# EAGLE board Mechanical_Clock (EAGLE 9.7.0)
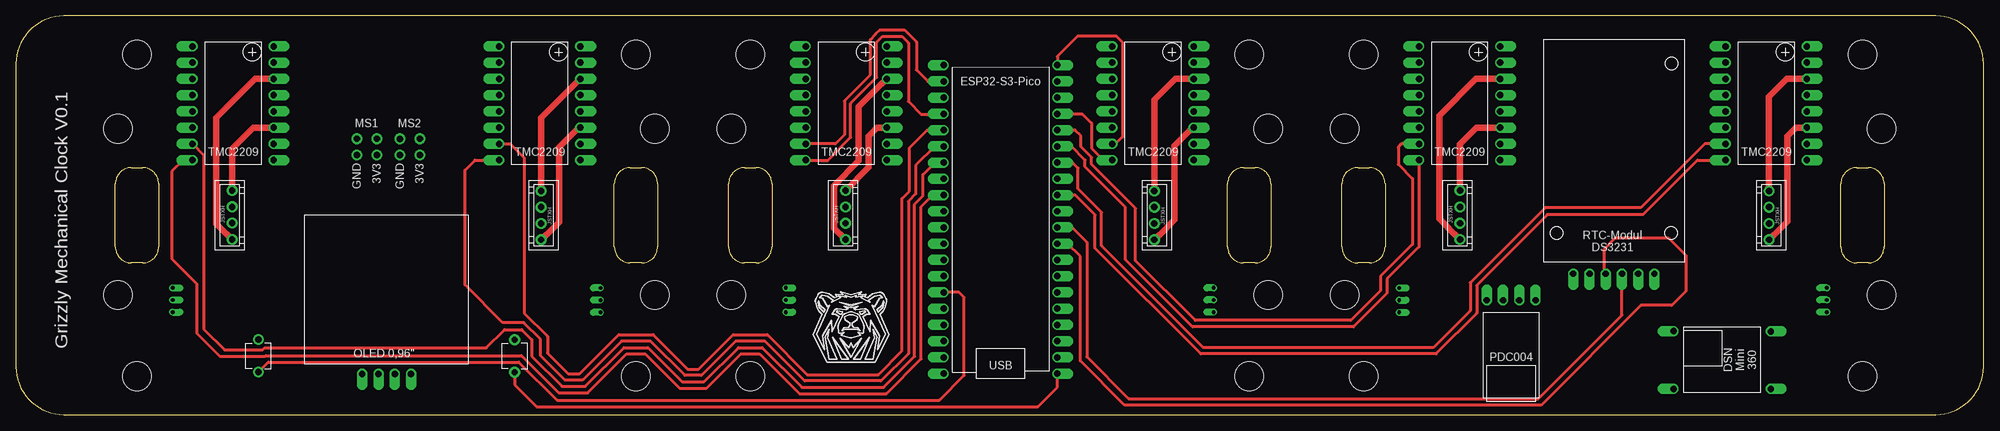
[diagram p0: board, top side]
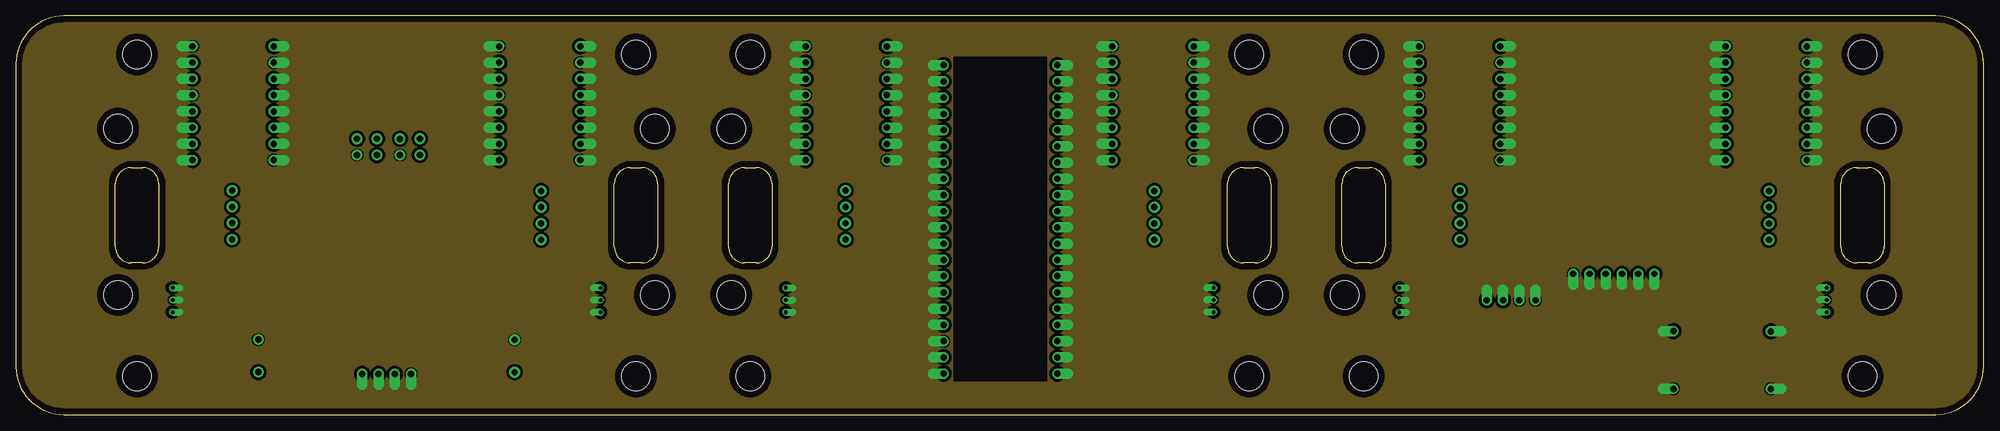
[diagram p1: board, inner layer Route2]
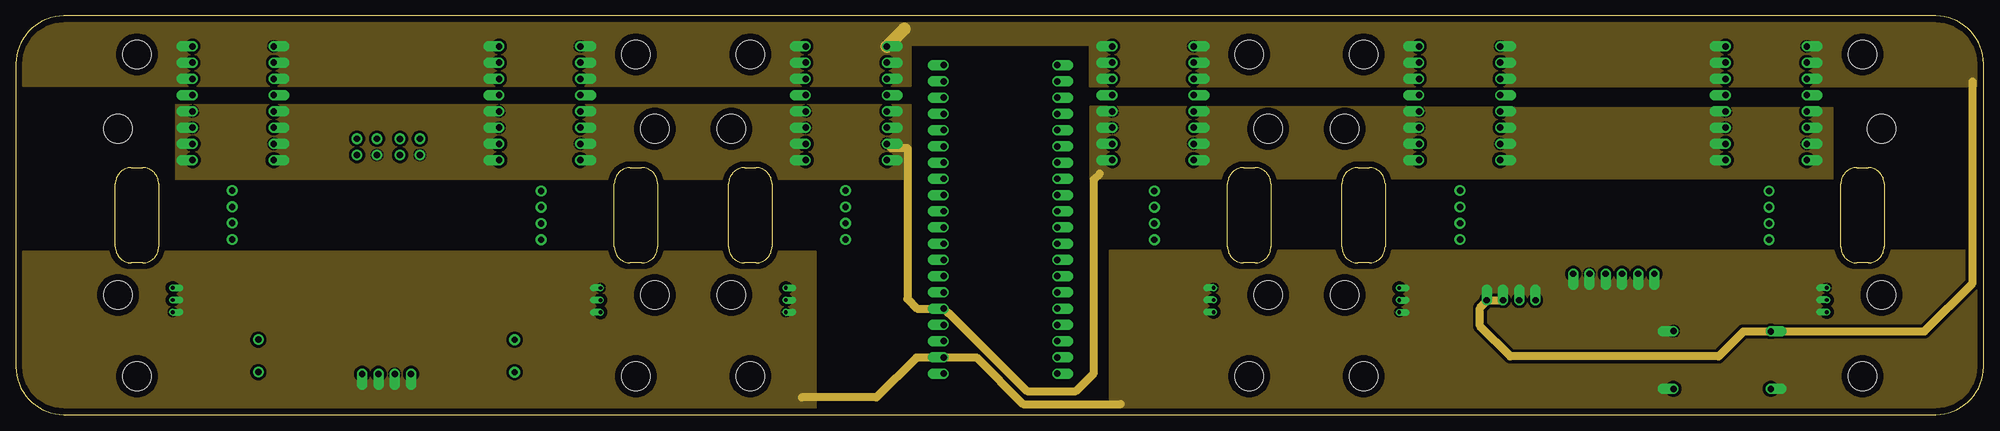
[diagram p2: board, inner layer Route63]
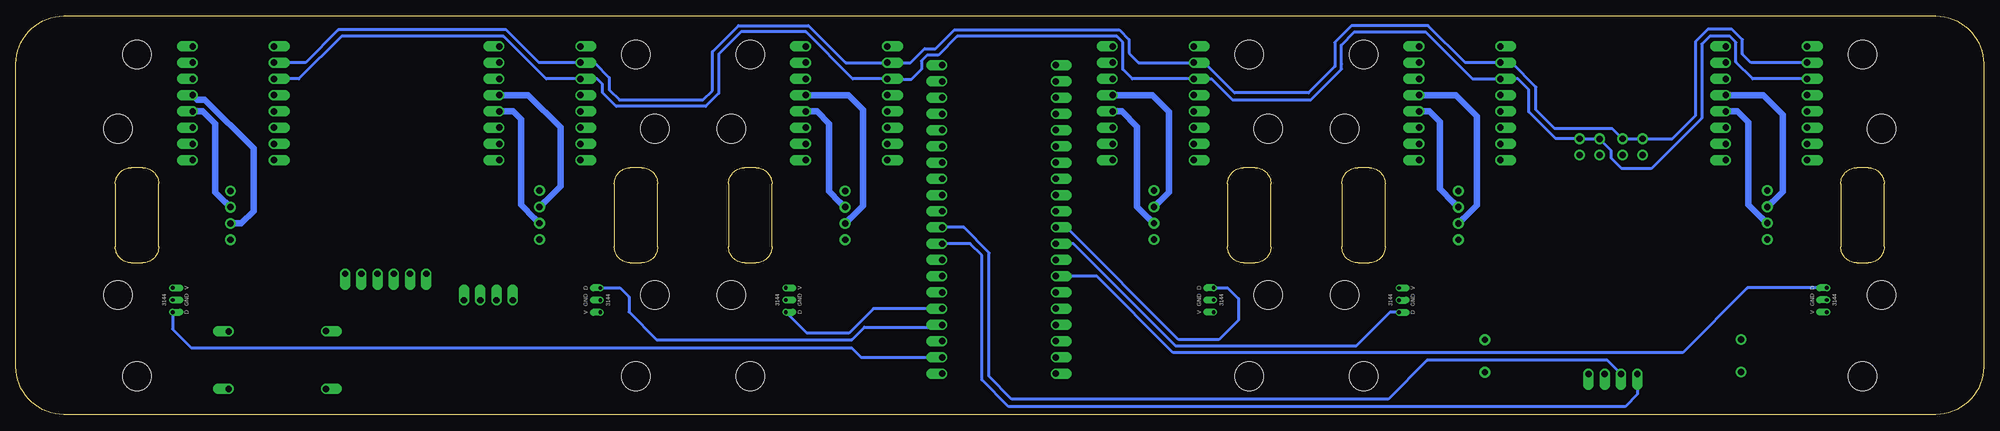
[diagram p3: board, bottom side, seen from below]

Size 308 x 62.38 mm. Coordinates in mm from the lower left corner, seen from the top.
Outline: 207.56,26.25 arc90 210.06,23.75 211.83,23.75 arc90 214.33,26.25 214.33,36.14 arc90 211.83,38.64 210.06,38.64 arc90 207.56,36.14 207.56,26.25
Outline: 93.67,26.25 arc90 96.17,23.75 97.94,23.75 arc90 100.44,26.25 100.44,36.14 arc90 97.94,38.64 96.17,38.64 arc90 93.67,36.14 93.67,26.25
Outline: 189.67,26.25 arc90 192.17,23.75 193.94,23.75 arc90 196.44,26.25 196.44,36.14 arc90 193.94,38.64 192.17,38.64 arc90 189.67,36.14 189.67,26.25
Outline: 111.56,26.25 arc90 114.06,23.75 115.83,23.75 arc90 118.33,26.25 118.33,36.14 arc90 115.83,38.64 114.06,38.64 arc90 111.56,36.14 111.56,26.25
Outline: 15.56,26.25 arc90 18.06,23.75 19.83,23.75 arc90 22.33,26.25 22.33,36.14 arc90 19.83,38.64 18.06,38.64 arc90 15.56,36.14 15.56,26.25
Outline: 289.94,23.75 arc90 292.44,26.25 292.44,36.14 arc90 289.94,38.64 288.17,38.64 arc90 285.67,36.14 285.67,26.25 arc90 288.17,23.75 289.94,23.75
Outline: 300.5,62.38 7.5,62.38 arc90 0,54.88 0,7.5 arc90 7.5,0 300.5,0 arc90 308,7.5 308,54.88 arc90 300.5,62.38
Copper layers (1+2*15+16): Top / Route2 / Route63 / Bottom
Stack-up 4 Layer Stack: Top SilkScreen Epoxy Ink / Top SolderMask SR:Green 0.0254mm Dk 4.3 / Top Surface Finish Lead-Free 0.02mm / Top CuFoil:007 0.035mm / Dielectric-1 Prepreg:001 0.064mm / Dielectric-2 Prepreg:001 0.064mm / Route2 CuFoil:007 0.035mm / Dielectric-3 Core:066 0.711mm / Route63 CuFoil:007 0.035mm / Dielectric-4 Prepreg:001 0.064mm / Dielectric-5 Prepreg:001 0.064mm / Bottom CuFoil:007 0.035mm / Bottom Surface Finish Lead-Free 0.02mm / Bottom SolderMask SR:Green 0.0254mm Dk 4.3 / Bottom SilkScreen Epoxy Ink
Design rules: minimum drill size 0.35mm, minimum copper width 0.3mm, keepout clearance 0mil, drill distance 6mil, via restrict clearance 0mil, dimension clearance 1mm, restrict clearance 0mil, copper clearance wire_polygon to wire_polygon 0.5mm, copper clearance wire_polygon to pad_smd 0.5mm, copper clearance wire_polygon to via 0.5mm, copper clearance pad_smd to pad_smd 0.5mm, copper clearance pad_smd to via 0.5mm, copper clearance via to via 0.5mm, copper clearance smd to pad (same net) 0.5mm, copper clearance smd to via (same net) 0.5mm, copper clearance smd to smd (same net) 0.5mm
Holes 4.5 mm at 196,18.73 208,18.73 114.95,6 289.05,6 193.05,6 289.05,56.38 193.05,56.38 97.05,6 210.95,6 208,44.73 100,44.73 196,44.73 16,44.73 97.05,56.38 210.95,56.38 18.95,6 292,44.73 112,44.73 114.95,56.38 292,18.73 18.95,56.38 16,18.73 112,18.73 100,18.73
RestrictCopper: area 146.8,5.2 to 161.4,56

## Footprints (pad centres in the part's own frame; a part is rotated, then mirrored left to right if it is on the bottom)
ESP32-S3-PICO = drill 1 pad 1.676 offset: 3V3 12.7,-2.54; 3V3_EN 12.7,0; GND1 -5.08,2.54; GND2 -5.08,-10.16; GND3 -5.08,-22.86; GND4 -5.08,-35.56; GND5 12.7,-35.56; GND6 12.7,-22.86; GND7 12.7,-10.16; GND8 12.7,2.54; GPIO1 12.7,-33.02; GPIO2 12.7,-30.48; GPIO4 12.7,-27.94; GPIO5 12.7,-25.4; GPIO6 12.7,-20.32; GPIO7 12.7,-15.24; GPIO8 12.7,-12.7; GPIO9 12.7,-7.62; GPIO10 12.7,-5.08; GPIO11 -5.08,7.62; GPIO12 -5.08,5.08; GPIO13 -5.08,0; GPIO14 -5.08,-2.54; GPIO15 -5.08,-5.08; GPIO16 -5.08,-7.62; GPIO17 -5.08,-12.7; GPIO18 -5.08,-15.24; GPIO33 -5.08,-17.78; GPIO34 -5.08,-20.32; GPIO35 -5.08,-25.4; GPIO36 -5.08,-27.94; GPIO37 -5.08,-30.48; GPIO38 -5.08,-33.02; GPIO39 -5.08,-38.1; GPIO40 -5.08,-40.64; GPIO41 12.7,-38.1; GPIO42 12.7,-40.64; RUN 12.7,-17.78; VBUS 12.7,7.62; VSYS 12.7,5.08
PDC004-PD = drill 1 pad 1.676 offset: GND1 1.27,2.54; GND2 3.81,2.54; V1 -3.81,2.54; V2 -1.27,2.54
DSN-MINI-360 = drill 1 pad 1.676 offset: IN+ 3.819,-9.86; IN- -5.18,-9.86; OUT+ 3.86,5.371; OUT- -5.18,5.38
OLED_0,96 = drill 1 pad 1.676 offset: GND 4.65,18.45; SCL 9.75,18.45; SDA 12.3,18.45; VCC 7.2,18.45
DS3231_RTC_MODUL = drill 1 pad 1.676 offset: 32K -0.21,3.81; GND 12.49,3.81; SCL 4.87,3.81; SDA 7.41,3.81; SQW 2.33,3.81; VCC 9.95,3.81
TMC2209 = drill 1 pad 1.676 offset: 1A 7.62,-6.35; 1B 7.62,-8.89; 2A 7.62,-3.81; 2B 7.62,-1.27; DIR -5.08,-13.97; EN -5.08,3.81; GND 7.62,1.27; GND1 7.62,-13.97; MS1 -5.08,1.27; MS2 -5.08,-1.27; RX -5.08,-8.89; SPREAD -5.08,-3.81; STEP -5.08,-11.43; TX -5.08,-6.35; VIO 7.62,-11.43; VMOT 7.62,3.81
JSTXH_4POL = drill 1 pad 1.676: 1 -0.2,2.45; 2 -0.2,-0.1; 3 -0.2,-2.65; 4 -0.2,-5.2
LOETBRUECKE = drill 1 pad 1.676: 1 0,-2.54; 2 0,0
A3144 = drill 0.6 offset: DATA 1.905,1.27; GND 0,1.27; V -1.905,1.27
SCHALTER_5X5 = drill 1 pad 1.676: 1 -2.54,0; 2 2.54,0

## Placement (x,y rotation side)
U$1  ESP32-S3-PICO  [ESP32-S3-PICO]  157.93,14.04 180 top
U$2  PDC004-PD  [PDC004-PD]  234.05,15.35 0 top
U$3  DSN-MINI-360  [DSN-MINI-360]  264.84,9.21 90 top
U$4  OLED_0,96  [OLED_0,96]  66.49,24.81 180 top
U$5  DS3231_RTC_MODUL  [DS3231_RTC_MODUL]  256.26,25.84 180 top
U$6  TMC2209  [TMC2209]  80.71,53.8 0 top
U$7  JSTXH_4POL  [JSTXH_4POL]  82.01,29.81 180 top
U$8  TMC2209  [TMC2209]  32.72,53.8 0 top
U$9  JSTXH_4POL  [JSTXH_4POL]  34.04,32.61 0 top
U$10  LOETBRUECKE  [LOETBRUECKE]  56.51,43.16 0 top
U$11  LOETBRUECKE  [LOETBRUECKE]  63.22,43.17 0 top
U$12  LOETBRUECKE  [LOETBRUECKE]  53.38,43.16 0 top
U$13  LOETBRUECKE  [LOETBRUECKE]  60.12,43.16 0 top
U$14  A3144  [A3144]  23.25,17.94 90 bottom
U$15  SCHALTER_5X5  [SCHALTER_5X5]  37.94,9.19 90 top
U$16  SCHALTER_5X5  [SCHALTER_5X5]  78.06,9.17 90 top
U$17  A3144  [A3144]  92.78,17.91 270 bottom
U$18  TMC2209  [TMC2209]  128.71,53.8 0 top
U$19  JSTXH_4POL  [JSTXH_4POL]  130.06,32.6 0 top
U$20  A3144  [A3144]  119.23,17.93 90 bottom
U$21  TMC2209  [TMC2209]  176.71,53.8 0 top
U$22  JSTXH_4POL  [JSTXH_4POL]  178,29.81 180 top
U$23  A3144  [A3144]  188.75,17.94 270 bottom
U$24  TMC2209  [TMC2209]  224.71,53.8 0 top
U$25  JSTXH_4POL  [JSTXH_4POL]  226.24,32.6 0 top
U$26  A3144  [A3144]  215.25,17.91 90 bottom
U$27  TMC2209  [TMC2209]  272.71,53.8 0 top
U$28  JSTXH_4POL  [JSTXH_4POL]  274.21,29.81 180 top
U$29  A3144  [A3144]  284.74,17.94 270 bottom

## Library data of the parts
U$1-U$29 = Library FÖB

## Nets
3V3: U$1.3V3 U$6.RX U$6.TX U$6.VIO U$8.RX U$8.TX U$8.VIO U$10.1 U$11.1 U$18.RX U$18.TX U$18.VIO U$21.RX U$21.TX U$21.VIO U$24.RX U$24.TX U$24.VIO U$27.RX U$27.TX U$27.VIO
5V: U$1.VSYS U$3.OUT+ U$4.VCC U$5.VCC U$14.V U$17.V U$20.V U$23.V U$26.V U$29.V
20V: U$2.V1 U$2.V2 U$3.IN+ U$6.VMOT U$8.VMOT U$18.VMOT U$21.VMOT U$24.VMOT U$27.VMOT
BUTTON_MENU: U$1.GPIO10 U$15.1
BUTTON_SETTING: U$1.GPIO11 U$16.1
GND: U$1.GND8 U$2.GND1 U$2.GND2 U$3.IN- U$3.OUT- U$4.GND U$5.GND U$6.EN U$6.GND U$6.GND1 U$6.SPREAD U$8.EN U$8.GND U$8.GND1 U$8.SPREAD U$12.1 U$13.1 U$14.GND U$15.2 U$16.2 U$17.GND U$18.EN U$18.GND U$18.GND1 U$18.SPREAD U$20.GND U$21.EN U$21.GND U$21.GND1 U$21.SPREAD U$23.GND U$24.EN U$24.GND U$24.GND1 U$24.SPREAD U$26.GND U$27.EN U$27.GND U$27.GND1 U$27.SPREAD U$29.GND
I2C_SCL: U$1.GPIO18 U$4.SCL U$5.SCL
I2C_SDA: U$1.GPIO17 U$4.SDA U$5.SDA
MOTOR1_1A: U$8.1A U$9.3
MOTOR1_1B: U$8.1B U$9.1
MOTOR1_2A: U$8.2A U$9.2
MOTOR1_2B: U$8.2B U$9.4
MOTOR1_DIR: U$1.GPIO6 U$8.DIR
MOTOR1_HALLSENSOR: U$1.GPIO9 U$14.DATA
MOTOR1_STEP: U$1.GPIO5 U$8.STEP
MOTOR2_1A: U$6.1A U$7.3
MOTOR2_1B: U$6.1B U$7.1
MOTOR2_2A: U$6.2A U$7.2
MOTOR2_2B: U$6.2B U$7.4
MOTOR2_DIR: U$1.GPIO4 U$6.DIR
MOTOR2_HALLSENSOR: U$1.GPIO8 U$17.DATA
MOTOR2_STEP: U$1.GPIO2 U$6.STEP
MOTOR3_1A: U$18.1A U$19.3
MOTOR3_1B: U$18.1B U$19.1
MOTOR3_2A: U$18.2A U$19.2
MOTOR3_2B: U$18.2B U$19.4
MOTOR3_DIR: U$1.GPIO1 U$18.DIR
MOTOR3_HALLSENSOR: U$1.GPIO7 U$20.DATA
MOTOR3_STEP: U$1.GPIO41 U$18.STEP
MOTOR4_1A: U$21.1A U$22.3
MOTOR4_1B: U$21.1B U$22.1
MOTOR4_2A: U$21.2A U$22.2
MOTOR4_2B: U$21.2B U$22.4
MOTOR4_DIR: U$1.GPIO38 U$21.DIR
MOTOR4_HALLSENSOR: U$1.GPIO14 U$23.DATA
MOTOR4_STEP: U$1.GPIO40 U$21.STEP
MOTOR5_1A: U$24.1A U$25.3
MOTOR5_1B: U$24.1B U$25.1
MOTOR5_2A: U$24.2A U$25.2
MOTOR5_2B: U$24.2B U$25.4
MOTOR5_DIR: U$1.GPIO36 U$24.DIR
MOTOR5_HALLSENSOR: U$1.GPIO13 U$26.DATA
MOTOR5_STEP: U$1.GPIO37 U$24.STEP
MOTOR6_1A: U$27.1A U$28.3
MOTOR6_1B: U$27.1B U$28.1
MOTOR6_2A: U$27.2A U$28.2
MOTOR6_2B: U$27.2B U$28.4
MOTOR6_DIR: U$1.GPIO34 U$27.DIR
MOTOR6_HALLSENSOR: U$1.GPIO12 U$29.DATA
MOTOR6_STEP: U$1.GPIO35 U$27.STEP
MS1: U$6.MS1 U$8.MS1 U$10.2 U$12.2 U$18.MS1 U$21.MS1 U$24.MS1 U$27.MS1
MS2: U$6.MS2 U$8.MS2 U$11.2 U$13.2 U$18.MS2 U$21.MS2 U$24.MS2 U$27.MS2
N$1: U$1.GND7
N$2: U$1.GPIO33

## Tracks (layer width: path | path; a pad name or v marks a point on that pad's centre or on a via)
3V3
  Route63 1.27: U$18.VIO 136.98,41.72 139.53,41.72 139.53,18.11 141.06,16.58 U$1.3V3 145.88,15.93 146.02,15.93 158.29,3.65 165.9,3.65 168.72,6.47 168.72,36.79 169.65,37.72
  pour Route63: 168.06,48.31 168.06,36.79 284.5,36.79 284.5,48.1
  pour Route63: 24.95,48.6 140.16,48.6 140.16,36.74 24.95,36.74
5V
  Route63 1.27: 122.99,2.69 134.7,2.69 140.94,8.93 145.2,8.93 U$1.VSYS 150.34,8.96 157.66,1.64 172.91,1.64
  pour Route63: -6.38,25.61 125.32,25.61 125.32,-7.99 -3.86,-7.99 -3.86,3.08 -3.76,3.08 -3.76,4.76
  pour Route63: 322.28,-11 171.1,-11 171.1,25.76 318.05,25.76 318.05,19.22 319.2,19.22
20V
  Route63 1.27: U$2.V1 U$2.V2 230.36,17.89 229.17,16.7 229.17,13.85 233.9,9.12 266.54,9.12 270.45,13.03 U$3.IN+ 298.76,13.03 306.31,20.58 306.31,52.09
  Route63 2: U$18.VMOT 139.05,60.33
  pour Route63: 167.97,66.02 167.97,51.26 313.86,51.26 313.86,66.35
  pour Route63: -10.12,70.7 -10.12,51.31 140.15,51.31 140.15,71.96 139.34,71.96
  pour Route63: 136.54,68.51 136.54,57.69 182.85,57.69 182.85,69.04 182.13,69.04
BUTTON_MENU
  Top 0.508: U$1.GPIO10 147.64,19.12 148.42,18.34 148.42,6.14 144.54,2.26 84.69,2.26 78.72,8.23 39.52,8.23 39.43,8.14 | U$15.1 39.43,8.14 | 39.43,8.14
BUTTON_SETTING
  Top 0.508: U$16.1 78.06,4.68 81.49,1.25 159.96,1.25 163.01,4.3 U$1.GPIO11
GND
  pour Route2: -7.77,69.71 325.28,69.71 325.28,-22.06 -9.77,-22.06 -9.77,-7.16
I2C_SCL
  Top 0.508: U$5.SCL 251.39,15.58 238.31,2.5 174.18,2.5 167.64,9.04 167.64,26.95 165.31,29.28 U$1.GPIO18
  Bottom 0.508: U$1.GPIO18 159.63,29.28 155.67,25.32 155.67,5.97 152.12,2.42 93.17,2.42 87.11,8.49 58.87,8.49 U$4.SCL
I2C_SDA
  Top 0.508: U$1.GPIO17 164.62,26.74 166.6,24.77 166.6,8.42 173.53,1.49 238.76,1.49 254.37,17.1 259.18,17.1 261.36,19.28 261.36,24.91 258.63,27.64 250.38,27.64 248.65,25.91 248.65,22.23 U$5.SDA
  Bottom 0.508: U$4.SDA 54.19,3.16 56.1,1.25 152.62,1.25 156.81,5.44 156.81,24.92 158.63,26.74 U$1.GPIO17
MOTOR1_1A
  Bottom 1: U$9.3 34.56,30.68 34.6,30.68 36.79,32.86 36.79,45.71 38.53,47.45 U$8.1A
MOTOR1_1B
  Top 1: U$9.1 33.84,41.62 37.13,44.91 U$8.1B
MOTOR1_2A
  Bottom 1: U$9.2 33.13,33.23 33.08,33.23 31.41,34.89 31.41,46.92 34.48,49.99 U$8.2A
MOTOR1_2B
  Top 1: U$9.4 33.13,28.13 33.08,28.13 31.36,29.84 31.36,46.47 37.42,52.53 U$8.2B
MOTOR1_DIR
  Top 0.5: U$8.DIR 26.19,39.83 24.41,38.05 24.41,24.38 28.32,20.47 28.32,12.7 31.88,9.15 39.02,9.15 39.1,9.23 79.14,9.23 84.97,3.4 89.51,3.4 95.6,9.5 98.5,9.5 103.88,4.12 108.12,4.12 113.5,9.5 116.4,9.5 122.63,3.27 136.24,3.27 141.68,8.71 141.68,32.54 143.51,34.36 U$1.GPIO6
MOTOR1_HALLSENSOR
  Bottom 0.508: U$14.DATA 36.96,19.85 47.1,9.71 126.85,9.71 138.81,21.66 U$1.GPIO9
MOTOR1_STEP
  Top 0.5: U$8.STEP 29.41,40.6 29.41,13.39 32.66,10.15 38.6,10.15 38.9,10.44 73.63,10.44 76.49,13.3 79.17,13.3 80.73,11.74 80.73,9.16 85.49,4.4 89.09,4.4 95.19,10.5 98.92,10.5 104.29,5.12 107.71,5.12 113.08,10.5 116.81,10.5 123.05,4.27 135.82,4.27 140.68,9.13 140.68,32.96 141.97,34.24 141.97,37.56 143.85,39.44 U$1.GPIO5
MOTOR2_1A
  Bottom 1: U$7.3 82.93,33.18 82.97,33.18 85.13,35.33 85.13,45.84 86.74,47.45 U$6.1A
MOTOR2_1B
  Top 1: U$7.1 82.93,28.08 82.97,28.08 85.03,30.13 85.03,41.86 88.08,44.91 U$6.1B
MOTOR2_2A
  Bottom 1: U$7.2 81.5,30.63 81.45,30.63 79.32,32.75 79.32,46.68 82.63,49.99 U$6.2A
MOTOR2_2B
  Top 1: U$6.2B 87.63,51.83 87.57,51.83 82.21,46.47 U$7.4
MOTOR2_DIR
  Top 0.5: U$6.DIR 71.84,39.83 70.27,38.26 70.27,20.29 76.18,14.38 79.5,14.38 82.11,11.77 82.11,9.21 85.92,5.4 88.68,5.4 94.77,11.5 99.33,11.5 104.71,6.12 107.29,6.12 112.67,11.5 117.23,11.5 123.46,5.27 135.41,5.27 139.68,9.54 139.68,33.37 140.85,34.54 140.85,38.99 143.85,41.98 U$1.GPIO4
MOTOR2_HALLSENSOR
  Bottom 0.508: U$17.DATA 92.93,16.01 98.22,10.72 126.44,10.72 142.46,26.74 U$1.GPIO8
MOTOR2_STEP
  Top 0.5: U$6.STEP 77.38,42.37 79.57,40.18 79.57,15.88 83.2,12.25 83.2,9.62 86.42,6.4 88.26,6.4 94.36,12.5 99.75,12.5 105.12,7.12 106.88,7.12 112.25,12.5 117.64,12.5 123.87,6.27 135,6.27 138.68,9.95 138.68,33.78 139.85,34.95 139.85,41.72 142.65,44.52 U$1.GPIO2
MOTOR3_1A
  Bottom 1: U$19.3 130.58,30.67 130.62,30.67 132.49,32.53 132.49,45.06 134.88,47.45 U$18.1A
MOTOR3_1B
  Top 1: U$19.1 133.49,38.68 133.49,43.58 134.82,44.91 U$18.1B
MOTOR3_2A
  Bottom 1: U$19.2 129.15,33.22 129.1,33.22 127.48,34.83 127.48,47.41 130.06,49.99 U$18.2A
MOTOR3_2B
  Top 1: U$18.2B 135.63,51.83 135.57,51.83 131.92,48.18 131.92,39.71 128.03,35.81 128.03,29.19 129.1,28.12 129.15,28.12 U$19.4
MOTOR3_DIR
  Top 0.5: U$1.GPIO1 145.15,46.98 141.71,46.98 139.7,49 139.7,58.17 138.67,59.2 135.68,59.2 134.75,58.27 134.75,52.77 130.67,48.7 130.67,43.37 127.14,39.83 U$18.DIR
MOTOR3_HALLSENSOR
  Bottom 0.508: U$20.DATA 118.33,19.84 116.63,18.14 116.63,14.78 119.69,11.72 126.02,11.72 143.58,29.28 U$1.GPIO7
MOTOR3_STEP
  Top 0.5: U$1.GPIO41 142.76,52.14 140.97,53.94 140.97,58.32 139.08,60.2 135.23,60.2 134.59,59.56 134.59,59.53 133.75,58.69 133.75,53.19 129.67,49.11 129.67,43.78 128.26,42.37 U$18.STEP
MOTOR4_1A
  Bottom 1: U$22.3 178.92,33.18 178.96,33.18 180.7,34.91 180.7,45.53 182.62,47.45 U$21.1A
MOTOR4_1B
  Top 1: U$22.1 178.92,28.08 178.96,28.08 181.35,30.46 181.35,42.09 184.17,44.91 U$21.1B
MOTOR4_2A
  Bottom 1: U$22.2 177.49,30.63 177.44,30.63 175.39,32.67 175.39,47.72 177.66,49.99 U$21.2A
MOTOR4_2B
  Top 1: U$22.4 178.2,49.25 181.48,52.53 U$21.2B
MOTOR4_DIR
  Top 0.5: U$1.GPIO38 166.9,47.06 168.37,45.6 168.37,41.72 170.25,39.83 U$21.DIR
MOTOR4_HALLSENSOR
  Bottom 0.508: U$1.GPIO14 173.78,16.58 177.61,12.75 184.2,12.75 U$23.DATA
MOTOR4_STEP
  Top 0.5: U$21.STEP 172.12,42.37 173.22,43.48 173.22,58.27 172.29,59.2 166.16,59.2 163.01,56.05 U$1.GPIO40
MOTOR5_1A
  Bottom 1: U$25.3 226.76,30.67 226.8,30.67 228.95,32.81 228.95,46.2 230.2,47.45 U$24.1A
MOTOR5_1B
  Top 1: U$25.1 226.04,42.32 228.63,44.91 U$24.1B
MOTOR5_2A
  Bottom 1: U$25.2 225.33,33.22 225.28,33.22 222.74,35.75 222.74,44.94 227.79,49.99 U$24.2A
MOTOR5_2B
  Top 1: U$25.4 225.33,28.12 225.28,28.12 224.21,29.19 224.21,29.22 222.79,30.63 222.79,46.76 228.56,52.53 U$24.2B
MOTOR5_DIR
  Top 0.5: U$24.DIR 219.63,26.24 214.62,21.23 214.62,18.99 209.36,13.73 184.2,13.73 173.66,24.27 173.66,32.47 167.37,38.76 167.37,39.84 165.23,41.98 U$1.GPIO36
MOTOR5_HALLSENSOR
  Bottom 0.508: U$26.DATA 213.44,19.82 212.06,18.44 212.06,16.08 207.72,11.75 177.15,11.75 175.2,13.69 163.36,13.69 U$1.GPIO13
MOTOR5_STEP
  Top 0.5: U$24.STEP 216.9,42.37 216.37,41.84 216.37,39.18 218.63,36.91 218.63,26.66 213.62,21.65 213.62,19.41 208.95,14.73 184.61,14.73 175.28,24.06 175.28,32.26 168.37,39.18 168.37,40.25 166.7,41.93 166.7,43.62 165.79,44.52 U$1.GPIO37
MOTOR6_1A
  Bottom 1: U$28.3 275.13,33.18 275.17,33.18 276.8,34.8 276.8,45.51 278.74,47.45 U$27.1A
MOTOR6_1B
  Top 1: U$28.1 275.13,28.08 275.17,28.08 277.26,30.16 277.26,43.59 278.58,44.91 U$27.1B
MOTOR6_2A
  Bottom 1: U$27.2A 279.63,49.29 278.46,49.29 270.82,41.65 270.82,31.84 272.75,29.91 U$28.2
MOTOR6_2B
  Top 1: U$28.4 274.41,49.7 277.24,52.53 U$27.2B
MOTOR6_DIR
  Top 0.5: U$1.GPIO34 165.82,34.36 168.93,31.25 168.93,26.02 185.46,9.5 222.29,9.5 228.66,15.86 228.66,20.23 239.71,31.28 254.66,31.28 263.21,39.83 U$27.DIR
MOTOR6_HALLSENSOR
  Bottom 0.508: U$29.DATA 283.47,13.38 280.55,10.45 177.19,10.45 175.7,8.96 U$1.GPIO12
MOTOR6_STEP
  Top 0.5: U$1.GPIO35 165.42,39.44 166.28,38.58 166.28,35.32 169.93,31.66 169.93,26.44 185.87,10.5 221.88,10.5 227.66,16.28 227.66,20.64 239.39,32.37 254.34,32.37 264.34,42.37 U$27.STEP
MS1
  Bottom 0.5: U$8.MS1 36.4,55.07 37.76,56.43 37.76,58.69 39.4,60.33 43.15,60.33 45.1,58.38 45.1,46.8 48.74,43.16 U$12.2 U$10.2 58.11,44.76 67.14,44.76 70.05,47.68 70.05,51.26 73.86,55.07 U$6.MS1 81.13,55.07 86.94,60.88 98.92,60.88 101.55,58.25 101.55,54.52 101.52,54.48 105.65,50.34 117.22,50.34 121.95,55.07 U$18.MS1 132.26,55.07 133.75,56.56 133.75,58.69 135.26,60.2 161.1,60.2 164.03,57.27 165.76,57.27 167.96,55.07 U$21.MS1 178.13,55.07 183.94,60.88 194.92,60.88 198.98,56.82 198.98,50.7 200.44,49.23 213.52,49.23 215.12,50.83 215.12,52.74 217.45,55.07 U$24.MS1 226.13,55.07 231.26,60.2 257.54,60.2 262.66,55.07 U$27.MS1
MS2
  Bottom 0.5: U$8.MS2 36.12,52.53 38.76,55.17 38.76,58.27 39.69,59.2 42.87,59.2 44.1,57.97 44.1,46.39 52.01,38.49 56.62,38.49 58.26,40.13 58.26,41.3 U$13.2 63.21,43.16 U$11.2 66.96,43.17 71.18,47.39 71.18,50.84 72.87,52.53 U$6.MS2 80.01,52.53 87.36,59.88 98.5,59.88 100.55,57.83 100.55,54.93 100.52,54.9 100.52,54.07 105.28,49.3 117.6,49.3 120.83,52.53 U$18.MS2 133.24,52.53 134.75,54.04 134.75,58.27 135.68,59.2 160.69,59.2 163.62,56.27 165.35,56.27 166.28,55.34 166.28,54.03 167.87,52.43 171.53,52.43 U$21.MS2 177.01,52.53 184.36,59.88 194.5,59.88 197.98,56.41 197.98,50.29 200.03,48.23 214.05,48.23 216.19,50.37 216.19,51.73 216.99,52.53 U$24.MS2 225.01,52.53 231.68,59.2 257.05,59.2 263.71,52.53 U$27.MS2

## Text on the board
SilkscreenTop: MS1 | MS2 | GND | 3V3 | GND | 3V3 | Grizzly Mechanical Clock V0.1